# Altium PCB Solar.PcbDoc (part 2 of 2)
Units mm, origin at the board's own origin, x right, y up, seen from the top; angles counter-clockwise.
Board outline 89.66 x 101.6 mm, 2 copper layers (Top Layer, Bottom Layer); 143 components, 89 nets, 454 pads, 227 vias.
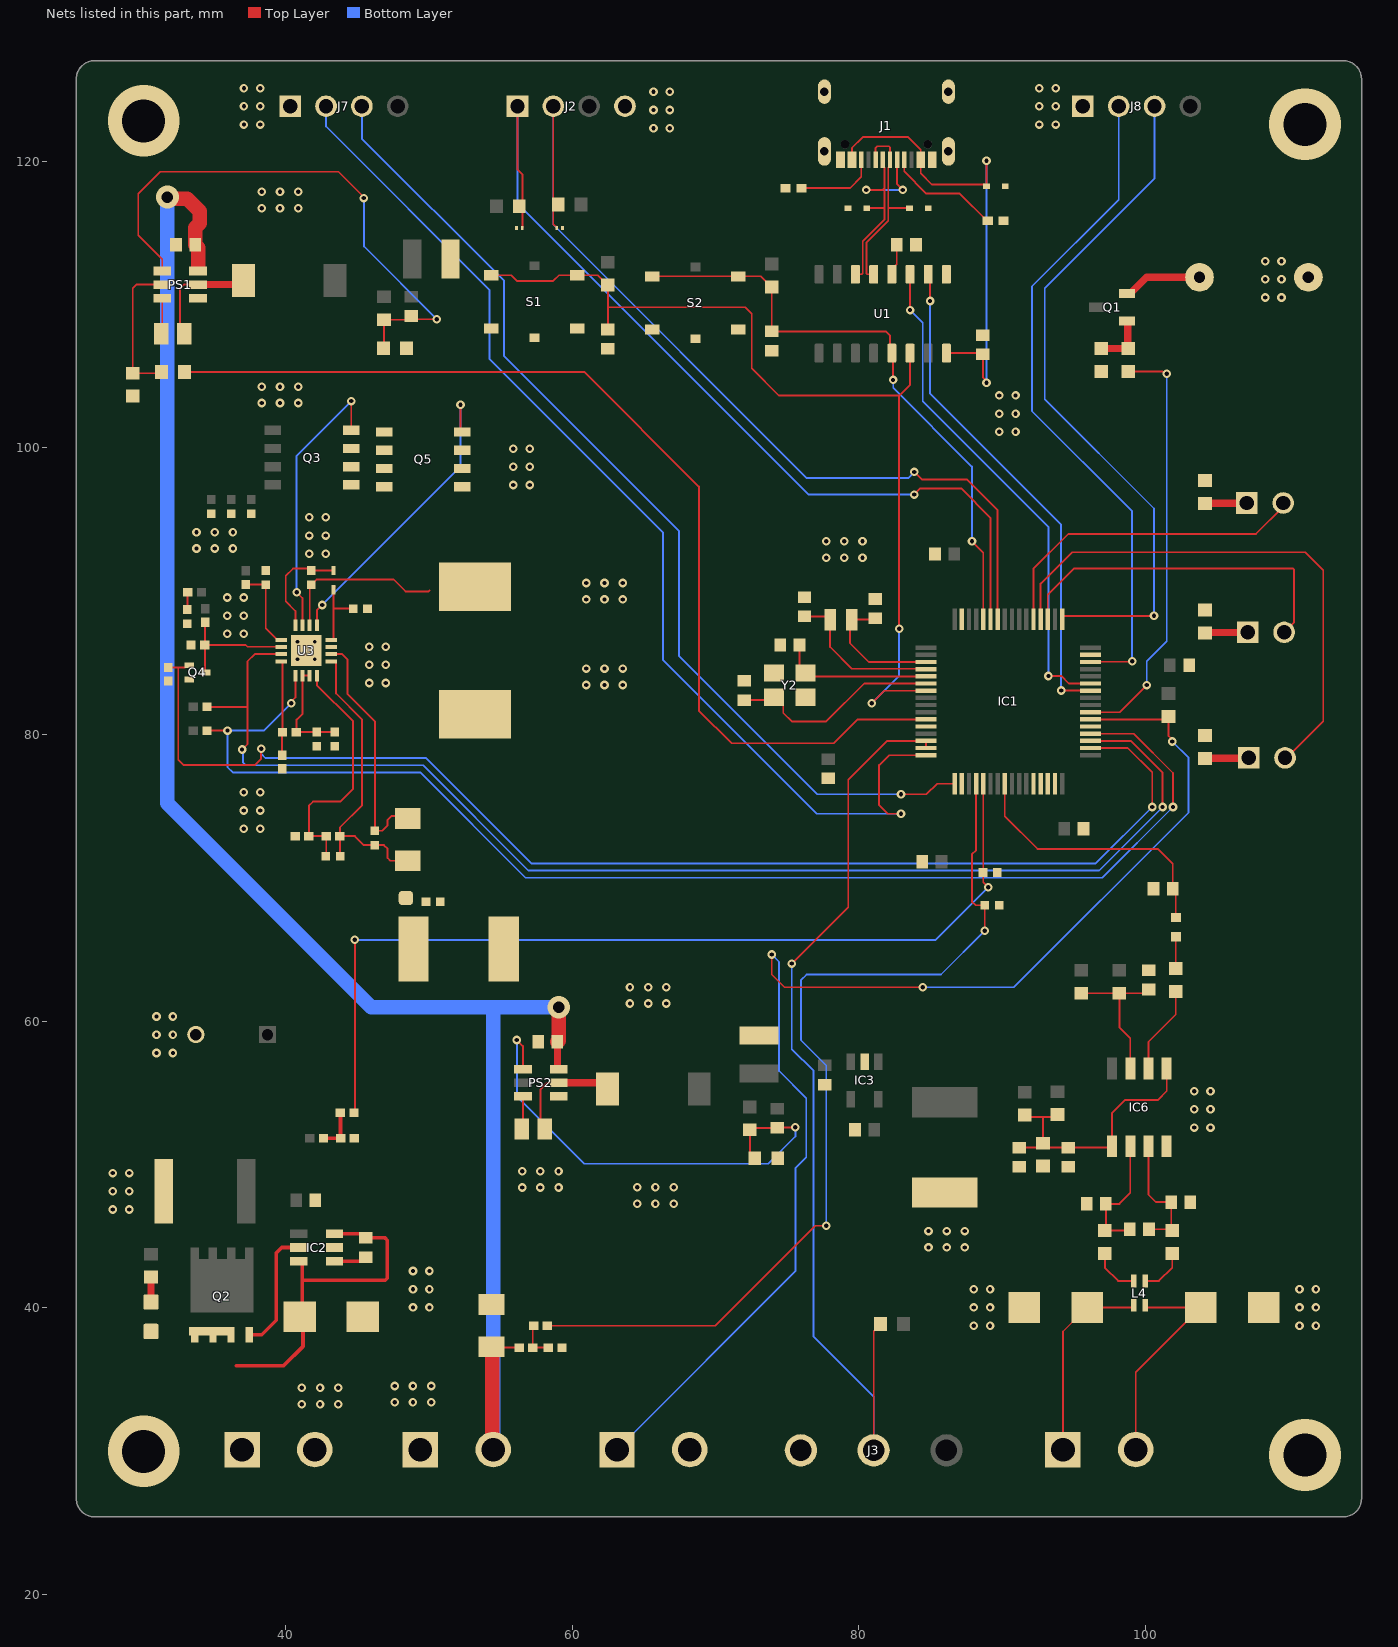
[diagram p2: the nets of this part, all layers, seen from the top]

## Via types
v1: diameter 0.6, hole 0.3, Top Layer to Bottom Layer, 168 vias
v2: diameter 0.6, hole 0.3, Top Layer to Bottom Layer, tented both sides, 49 vias
v3: diameter 0.508, hole 0.254, Top Layer to Bottom Layer, tented both sides, 4 vias
v4: diameter 5, hole 3, Top Layer to Bottom Layer, 4 vias
v5: diameter 1.6, hole 0.8, Top Layer to Bottom Layer, tented both sides, 2 vias

## Nets (pads, with @x,y where several pads share a name; then routed paths per layer and width w, separated by ;. In a path a pad name is that pad's centre, name@x,y a point inside that pad or via, vN(x,y) a via of type N, cw(c..) or ccw(c..) an arc to the next point about the centre after c; other vN are vias at no path point) (continued)
ADC_V_BAT: C14.1 IC1.20 R47.2 | length 65.6
  Top Layer w0.127: R47.2@58.26,38.735 69.977,38.735 76.962,45.72 v2(77.724,45.72) ; IC1.20@88.174,76.558 88.174,71.918 87.884,71.628 87.884,68.326 88.138,68.072 C14.1@88.781,68.072 88.773,68.064 v2(88.773,66.294)
  Bottom Layer w0.127: v2(77.724,45.72) 77.724,56.896 75.946,58.674 75.946,62.844 76.348,63.246 85.725,63.246 v2(88.773,66.294)
ADC_V_IN: C13.1 IC1.21 R46.2 | length 65.2
  Top Layer w0.127: R46.2@44.765,53.594 44.831,53.66 v2(44.831,65.659) ; IC1.21@88.674,76.558 88.674,69.695 v2(89.027,69.342)
  Bottom Layer w0.127: v2(44.831,65.659) 85.344,65.659 v2(89.027,69.342)
BAT+: C17.2 C21.2 F1.2 J9.2 PS1.3 PS2.3 R45.1 | length 126.6
  Top Layer w0.127: F1.2@54.422,37.212 54.423,37.211 R45.1@56.294,37.211
  Top Layer w0.508: C21.2@58.963,58.547 58.963,56.683 59.009,56.637 PS2.3@59.055,56.637
  Top Layer w1.016: v5(31.75,117.475) 31.862,117.363 33.132,117.363 33.996,116.499 33.996,115.657 33.69,115.351 C17.2@33.69,114.173 33.909,113.954 33.909,112.649 ; F1.2@54.361,37.273 54.422,37.212 54.422,30.16 J9.2@54.483,30.099 ; C21.2@58.963,58.547 59.055,58.639 v5(59.055,60.96)
  Bottom Layer w1.016: v5(31.75,117.475) 31.75,75.184 45.974,60.96 54.483,60.96 ; J9.2@54.483,30.099 54.483,60.96 ; v5(59.055,60.96) 54.483,60.96
BOOT: C5.1 IC1.60 R4.1 S2.1 S2.2 U1.13 | length 42.6
  Top Layer w0.127: S2.1@65.58,111.959 S2.2@71.58,111.959 73.134,111.959 73.889,111.204 R4.1@73.914,111.204 73.914,108.117 C5.1@73.919,108.112 81.88,108.112 82.169,107.823 82.169,106.724 82.381,106.512 v2(82.381,104.729) ; v2(87.884,93.472) 88.674,92.682 IC1.60@88.674,88.034
  Bottom Layer w0.127: v2(82.381,104.729) 82.388,104.722 82.388,104.175 87.884,98.679 v2(87.884,93.472)
BUZZER: IC1.39 R8.2 | length 29.7
  Top Layer w0.127: IC1.39@96.162,81.546 98.183,81.546 v2(100.076,83.439) ; R8.2@98.798,105.316 101.185,105.316 101.345,105.156 v2(101.473,105.156)
  Bottom Layer w0.127: v2(100.076,83.439) 100.076,85.09 101.473,86.487 v2(101.473,105.156)
CHARGE_DIS: IC1.34 Q4.1 R57.2 | length 89.5
  Top Layer w0.127: R57.2@31.817,84.668 32.512,84.668 ; Q4.1@33.274,84.82 33.149,84.82 32.997,84.668 32.512,84.668 ; v2(38.291,78.995) 38.291,78.296 37.846,77.851 32.893,77.851 32.512,78.232 32.512,84.668 ; IC1.34@96.162,79.046 98.754,79.046 100.457,77.343 v2(100.457,74.93)
  Bottom Layer w0.127: v2(38.291,78.995) 38.3,78.986 38.3,78.636 38.593,78.343 49.8,78.343 57.15,70.993 96.52,70.993 v2(100.457,74.93)
DBG_RX: IC1.43 U1.3 | length 35.2
  Top Layer w0.127: v2(83.566,109.601) U1.3@83.566,112.097 ; v2(93.218,84.074) 94.107,84.074 94.635,83.546 IC1.43@96.162,83.546
  Bottom Layer w0.127: v2(83.566,109.601) 84.455,108.712 84.455,103.251 93.218,94.488 v2(93.218,84.074)
DBG_SWCLK: IC1.49 J8.3 | length 48.5
  Top Layer w0.127: IC1.49@94.174,88.034 94.174,88.179 94.26,88.265 v2(100.584,88.265)
  Bottom Layer w0.127: v2(100.584,88.265) 100.584,95.758 92.964,103.378 92.964,111.125 100.624,118.785 J8.3@100.624,123.825
DBG_SWDIO: IC1.46 J8.2 | length 47.1
  Top Layer w0.127: IC1.46@96.162,85.046 96.184,85.068 99.038,85.068 v2(99.06,85.09)
  Bottom Layer w0.127: J8.2@98.124,123.825 98.124,117.301 92.075,111.252 92.075,102.552 99.06,95.567 v2(99.06,85.09)
DBG_TX: IC1.42 U1.2 | length 34.9
  Top Layer w0.127: U1.2@84.836,112.097 84.963,111.97 v2(84.963,110.236) ; v2(94.107,83.058) 94.113,83.052 96.156,83.052 IC1.42@96.162,83.046
  Bottom Layer w0.127: v2(84.963,110.236) 84.963,103.759 94.107,94.615 v2(94.107,83.058)
DE: IC1.28
DI: IC1.29
DIF_ADC: C36.1 FB1.2 IC1.24 | length 19.2
  Top Layer w0.127: IC1.24@90.174,76.558 90.174,74.291 92.456,72.009 100.838,72.009 101.889,70.958 C36.1@101.889,69.215 102.108,68.996 FB1.2@102.108,67.223
DIGITAL_IN: IC1.38 J4.1 R9.1 | length 89.7
  Top Layer w0.127: v2(73.914,64.643) 73.914,63.246 74.803,62.357 v2(84.455,62.357) ; IC1.38@96.162,81.046 101.404,81.046 R9.1@101.6,81.242 101.6,79.884 101.854,79.63 v2(101.854,79.502)
  Bottom Layer w0.127: J4.1@63.119,30.099 75.565,42.545 75.565,49.738 76.327,50.5 76.327,54.61 74.422,56.515 74.422,64.135 v2(73.914,64.643) ; v2(84.455,62.357) 90.805,62.357 102.997,74.549 102.997,78.359 v2(101.854,79.502)
FLOAT_IN: IC1.37
GND: C1.1 C2.1 C3.2 C4.2 C5.2 C6.1 C7.1 C8.2 C9.1 C10.2 C11.2 C12.2 C13.2 C14.2 C17.1 C19.1 C21.1 C23.1 C24.2 C25.2 C26.2 C27.2 C28.2 C32.2 C36.2 C37.2 C38.2 C39.1 C40.2 C41.1 C42.1 C43.1 C44.1 C45.1 C46.1 C47.2 C48.1 C52.2 C53.2 C55.1 C56.1 D1.1 D2.1 D3.1 D4.1 D5.1 D6.2 D7.C D16.2 D17.2 IC1.12 IC1.18 IC1.31 IC1.47 IC1.63 IC2.2 IC3.2 IC6.4 J1.A1_B12 J1.B1_A12 J1.S1 J1.S2 J1.S3 J1.S4 J2.4 J3.1 J4.2 J6.2 J7.1 J8.1 J9.1 LS1.2 PS1.1 PS2.1 Q4.3 Q5.1 Q5.2 Q5.3 R1.2 R2.1 R11.2 R14.1 R16.1 R20.2 R40.1 R43.1 R48.1 R49.2 R56.1 R57.1 R58.1 R60.1 R62.1 R63.1 S1.3 S1.4 S1.G2 S2.3 S2.4 S2.G2 U1.1 U3.11 U3.17 Y2.2 Y2.4
  other v1: 41.134,33.268 42.404,33.268 43.674,33.268 47.611,33.395 48.881,33.395 50.151,33.395 41.134,34.411 42.404,34.411 43.674,34.411 47.611,34.538 48.881,34.538 50.151,34.538 88.005,38.749 89.148,38.749 110.738,38.749 111.881,38.749 48.889,40.019 50.032,40.019 88.005,40.019 89.148,40.019 110.738,40.019 111.881,40.019 48.889,41.289 50.032,41.289 88.005,41.289 89.148,41.289 110.738,41.289 111.881,41.289 48.889,42.559 50.032,42.559 84.85,44.202 86.12,44.202 87.39,44.202 84.85,45.345 86.12,45.345 87.39,45.345 27.946,46.849 29.089,46.849 64.53,47.25 65.8,47.25 67.07,47.25 27.946,48.119 29.089,48.119 56.501,48.381 57.771,48.381 59.041,48.381 64.53,48.393 65.8,48.393 67.07,48.393 27.946,49.389 29.089,49.389 56.501,49.524 57.771,49.524 59.041,49.524 103.384,52.564 104.527,52.564 103.384,53.834 104.527,53.834 103.384,55.104 104.527,55.104 30.994,57.771 32.137,57.771 30.994,59.041 32.137,59.041 30.994,60.311 32.137,60.311 64.022,61.22 65.292,61.22 66.562,61.22 64.022,62.363 65.292,62.363 66.562,62.363 37.078,73.42 38.221,73.42 37.078,74.69 38.221,74.69 37.078,75.96 38.221,75.96 60.974,83.445 62.244,83.445 63.514,83.445 45.841,83.58 46.984,83.58 60.974,84.588 62.244,84.588 63.514,84.588 45.841,84.85 46.984,84.85 45.841,86.12 46.984,86.12 35.935,87.009 37.078,87.009 35.935,88.279 37.078,88.279 60.974,89.414 62.244,89.414 63.514,89.414 35.935,89.549 37.078,89.549 60.974,90.557 62.244,90.557 63.514,90.557 77.71,92.323 78.98,92.323 80.25,92.323 41.65,92.597 42.793,92.597 33.782,92.964 35.052,92.964 36.322,92.964 77.71,93.466 78.98,93.466 80.25,93.466 41.65,93.867 42.793,93.867 33.782,94.107 35.052,94.107 36.322,94.107 41.65,95.137 42.793,95.137 55.886,97.395 57.029,97.395 55.886,98.665 57.029,98.665 55.886,99.935 57.029,99.935 89.783,101.106 90.926,101.106 89.783,102.376 90.926,102.376 38.34,103.118 39.61,103.118 40.88,103.118 89.783,103.646 90.926,103.646 38.34,104.261 39.61,104.261 40.88,104.261 108.337,110.476 109.48,110.476 108.337,111.746 109.48,111.746 108.337,113.016 109.48,113.016 38.34,116.707 39.61,116.707 40.88,116.707 38.34,117.85 39.61,117.85 40.88,117.85 65.665,122.287 66.808,122.287 37.09,122.541 38.233,122.541 92.589,122.541 93.732,122.541 65.665,123.557 66.808,123.557 37.09,123.811 38.233,123.811 92.589,123.811 93.732,123.811 65.665,124.827 66.808,124.827 37.09,125.081 38.233,125.081 92.589,125.081 93.732,125.081
  other v3: 40.83,85.248 42.03,85.248 40.83,86.448 42.03,86.448
  other v4: 111.125,29.718 30.099,29.972 111.125,122.555 30.099,122.809
HSE_OSC_IN: C55.2 IC1.5 Y2.1 | length 10.6
  Top Layer w0.127: C55.2@75.854,86.233 75.854,84.719 76.527,84.046 IC1.5@84.686,84.046
HSE_OSC_OUT: C56.2 IC1.6 Y2.3 | length 14.9
  Top Layer w0.127: C56.2@72.009,82.388 73.883,82.388 Y2.3@74.084,82.589 74.184,82.589 74.721,82.052 74.721,81.489 75.311,80.899 77.724,80.899 80.371,83.546 IC1.6@84.686,83.546
I2C_1_CLK: D4.2 IC1.58 J2.2 R6.1 | length 64.1
  Top Layer w0.127: J2.2@58.674,123.825 58.674,115.6 58.909,115.365 D4.2@58.909,115.316 ; v2(83.862,98.309) 84.381,97.79 87.515,97.79 89.674,95.631 IC1.58@89.674,88.034
  Bottom Layer w0.127: J2.2@58.674,123.825 58.674,115.57 76.362,97.882 83.435,97.882 v2(83.862,98.309)
I2C_1_SDA: D5.2 IC1.59 J2.1 R5.1 | length 64.9
  Top Layer w0.127: J2.1@56.174,123.825 56.174,119.42 56.515,119.079 D5.2@56.515,115.316 ; v2(83.862,96.728) 84.289,97.155 87.122,97.155 89.174,95.103 IC1.59@89.174,88.034
  Bottom Layer w0.127: J2.1@56.174,123.825 56.174,117.042 76.488,96.728 v2(83.862,96.728)
LSE_OSC_IN: C7.2 IC1.3 Y1.1 | length 9.3
  Top Layer w0.127: C7.2@81.153,88.103 81.061,88.011 Y1.1@79.49,88.011 79.375,87.896 79.375,86.36 80.689,85.046 IC1.3@84.686,85.046
LSE_OSC_OUT: C6.2 IC1.4 Y1.2 | length 11.1
  Top Layer w0.127: C6.2@76.2,88.23 77.771,88.23 Y1.2@77.99,88.011 77.99,86.094 79.502,84.582 84.65,84.582 IC1.4@84.686,84.546
NetC2_2: C2.2 U1.4 | length 2.2
  Top Layer w0.127: U1.4@82.296,112.097 82.296,112.45 82.642,112.796 C2.2@82.642,114.173
NetC15_1: C15.1 D6.1 IC2.3 IC2.6 J6.1 Q2.1 Q2.2 Q2.3 Q2.10 | length 23.5
  Top Layer w0.254: 36.556,35.941 39.858,35.941 41.214,37.297 41.214,39.37 41.148,39.436 41.148,41.91 ; IC2.6@41.148,43.246 41.148,41.91 ; IC2.3@43.648,45.146 45.482,45.146 45.762,44.866 45.827,44.866 46.935,44.866 47.097,44.704 47.097,42.059 46.948,41.91 41.148,41.91
NetC15_2: C15.2 IC2.1 | length 2.3
  Top Layer w0.254: IC2.1@43.414,43.246 45.248,43.246 45.528,43.526 C15.2@45.593,43.526
NetC16_1: C16.1 L2.1 PS1.2 | length 7.9
  Top Layer w0.127: C16.1@32.931,107.95 32.639,108.242 32.639,111.125 32.893,111.379 PS1.2@33.889,111.379
  Top Layer w0.508: PS1.2@33.889,111.379 36.78,111.379 L2.1@37.059,111.658
NetC16_2: C16.2 PS1.6 | length 2.5
  Top Layer w0.127: C16.2@31.331,107.95 31.389,108.008 PS1.6@31.389,110.429
NetC18_1: C18.1 PS1.4 R13.1 R14.2 | length 39.7
  Top Layer w0.127: PS1.4@31.389,112.329 31.389,113.137 29.718,114.808 29.718,117.729 31.242,119.253 43.688,119.253 v2@45.466,117.475 ; R14.2@46.825,106.934 46.863,106.972 R13.1@46.863,108.928 48.511,108.928 C18.1@48.768,109.185 48.987,108.966 v2(50.546,108.966)
  Bottom Layer w0.127: v2@45.466,117.475 45.466,114.046 v2(50.546,108.966)
  other v2: 45.451,117.415
NetC20_1: C20.1 L3.1 PS2.2 | length 8
  Top Layer w0.127: C20.1@58.077,52.451 57.785,52.743 57.785,55.245 58.227,55.687 PS2.2@59.055,55.687
  Top Layer w0.508: PS2.2@59.055,55.687 62.017,55.687 L3.1@62.459,55.245
NetC20_2: C20.2 PS2.6 | length 2.3
  Top Layer w0.127: C20.2@56.477,52.451 56.555,52.529 PS2.6@56.555,54.737
NetC22_1: C22.1 PS2.4 R15.1 R16.2 | length 34.3
  Top Layer w0.127: v2(56.134,58.674) 56.555,58.253 PS2.4@56.555,56.637 ; R16.2@72.733,50.419 72.39,50.762 R15.1@72.39,52.413 72.52,52.543 C22.1@74.295,52.543 74.33,52.578 v2(75.565,52.578)
  Bottom Layer w0.127: v2(56.134,58.674) 56.134,54.737 60.833,50.038 73.66,50.038 75.565,51.943 v2(75.565,52.578)
NetC32_1: C32.1 IC6.7 R34.1 R64.1 | length 10.4
  Top Layer w0.127: R34.1@95.504,61.938 R64.1@98.171,61.938 ; IC6.7@98.933,56.687 98.933,58.801 98.171,59.563 R64.1@98.171,61.938 ; C32.1@100.203,62.195 99.946,61.938 R64.1@98.171,61.938
NetC35_1: C35.1 C39.2 IC6.2 R35.2 | length 9
  Top Layer w0.127: C35.1@98.898,45.466 98.809,45.377 R35.2@97.155,45.377 97.225,45.447 C39.2@97.225,47.244 98.171,47.244 98.933,48.006 IC6.2@98.933,51.263
NetC35_2: C35.2 C40.1 IC6.3 R36.2 | length 8.8
  Top Layer w0.127: IC6.3@100.203,51.263 100.203,47.879 100.711,47.371 C40.1@101.784,47.371 R36.2@101.784,45.447 ; C35.2@100.238,45.466 101.765,45.466 R36.2@101.784,45.447 ; R36.2@101.854,45.377 R36.2@101.784,45.447
NetC37_1: C37.1 C38.1 IC6.1 IC6.5 R42.1 R43.2 R65.1 | length 19
  Top Layer w0.127: C38.1@91.186,51.168 C37.1@94.615,51.168 97.568,51.168 IC6.1@97.663,51.263 97.663,53.594 98.552,54.483 100.838,54.483 101.473,55.118 IC6.5@101.473,56.687 ; R42.1@91.567,53.302 92.818,53.302 ; R43.2@92.837,51.473 92.837,53.283 92.818,53.302 ; R65.1@93.853,53.467 93.688,53.302 92.818,53.302
NetC43_2: C43.2 R51.2 U3.1 | length 5.8
  Top Layer w0.127: R51.2@37.211,90.457 38.583,90.457 C43.2@38.608,90.432 38.608,87.41 39.42,86.598 U3.1@39.68,86.598
NetC47_1: C47.1 R50.1 | length 1.2
  Top Layer w0.127: C47.1@33.147,88.712 33.163,88.728 33.163,89.9 R50.1@33.18,89.916
NetC48_2: C48.2 D18.1 U3.12 | length 5.2
  Top Layer w0.127: U3.12@43.18,86.598 43.263,86.598 43.339,86.675 43.339,88.773 ; D18.1@43.426,90.305 43.339,90.218 D18.1@43.339,90.08 43.339,88.773 ; C48.2@44.712,88.773 43.339,88.773
NetC49_1: C49.1 D18.2 U3.16 | length 7.5
  Top Layer w0.127: U3.16@40.68,87.598 40.68,88.606 40.005,89.281 40.005,91.059 40.513,91.567 41.648,91.567 C49.1@41.783,91.432 ; C49.1@41.783,91.178 C49.1@41.892,91.287 ; C49.1@41.785,91.43 D18.2@43.339,91.43
NetC49_2: C49.2 L1.1 Q3.1 Q3.2 Q3.3 Q5.5 Q5.6 Q5.7 Q5.8 U3.14 | length 11.7
  Top Layer w0.127: U3.14@41.68,87.598 41.68,90.329 C49.2@41.783,90.432 42.156,90.805 47.534,90.805 48.362,89.977 49.972,89.977 50.038,90.043
NetC51_2: C51.2 R55.1 R60.2 U3.8 | length 17.3
  Top Layer w0.127: U3.8@42.18,84.098 42.18,83.423 44.704,80.899 44.704,76.2 43.815,75.311 41.91,75.311 41.623,75.024 R60.2@41.623,72.898 R55.1@42.832,72.898 42.832,71.526 C51.2@42.807,71.501
NetD7_A: D7.A R12.2 | length 1.7
  Top Layer w0.508: D7.A@30.607,40.395 R12.2@30.607,42.126
NetD8_A: D8.A IC1.53 | length 23
  Top Layer w0.127: IC1.53@92.174,88.034 92.174,91.539 94.615,93.98 107.696,93.98 109.601,95.885 D8.A@109.601,96.139
NetD8_C: D8.C R40.2 | length 2.9
  Top Layer w0.508: R40.2@104.14,96.101 104.159,96.12 107.042,96.12 D8.C@107.061,96.139
NetD9_A: D9.A IC1.52 | length 37.9
  Top Layer w0.127: IC1.52@92.674,88.034 92.674,90.515 94.869,92.71 111.125,92.71 112.395,91.44 112.395,80.899 109.855,78.359 D9.A@109.728,78.359
NetD9_C: D9.C R62.2 | length 3.1
  Top Layer w0.508: R62.2@104.14,78.321 104.159,78.34 107.169,78.34 D9.C@107.188,78.359
NetD16_1: D16.1 J15.2 L4.4 | length 15.7
  Top Layer w0.127: J15.2@99.314,30.099 99.314,35.499 D16.1@103.82,40.005 ; L4.4@99.968,40.171 99.968,40.141 100.104,40.005 D16.1@103.82,40.005 ; D16.1@103.845,40.005 D16.1@103.82,40.005
NetD17_1: D17.1 J15.1 L4.1 | length 13.9
  Top Layer w0.127: J15.1@94.234,30.099 94.234,38.338 95.901,40.005 D17.1@95.926,40.005 99.032,40.005 99.168,40.141 L4.1@99.168,40.171
NetD19_A: D19.A IC1.51 | length 24.3
  Top Layer w0.127: IC1.51@93.174,88.034 93.174,89.745 94.996,91.567 110.289,91.567 110.363,91.493 110.363,87.82 D19.A@109.664,87.122
NetD19_C: D19.C R63.2 | length 3
  Top Layer w0.508: R63.2@104.14,87.084 104.159,87.103 107.105,87.103 D19.C@107.124,87.122
NetFB1_1: FB1.1 R41.2 | length 2.2
  Top Layer w0.127: R41.2@102.108,63.665 FB1.1@102.108,65.873
NetIC2_5: IC2.5 Q2.4 | length 8.7
  Top Layer w0.254: Q2.4@37.699,38.104 38.338,38.104 39.35,39.116 39.35,43.815 39.731,44.196 IC2.5@41.148,44.196
NetIC6_6: IC6.6 R41.1 | length 6.2
  Top Layer w0.127: IC6.6@100.203,56.687 100.203,58.547 102.108,60.452 R41.1@102.108,62.065
NetJ1_A5: J1.A5 R1.1 | length 8.1
  Top Layer w0.127: J1.A5@83.165,120.091 83.165,119.273 84.709,117.729 87.03,117.729 88.935,115.824 R1.1@88.985,115.824
NetJ1_B5: J1.B5 R2.2 | length 5.7
  Top Layer w0.127: R2.2@75.988,118.11 79.375,118.11 80.165,118.9 J1.B5@80.165,120.091
NetL4_2: L4.2 R35.1 | length 3.4
  Top Layer w0.127: R35.1@97.155,43.777 97.155,42.799 98.083,41.871 L4.2@99.168,41.871
NetL4_3: L4.3 R36.1 | length 3.2
  Top Layer w0.127: L4.3@99.968,41.871 100.926,41.871 101.854,42.799 R36.1@101.854,43.777
NetLS1_1: LS1.1 Q1.2 | length 5.5
  Top Layer w0.508: Q1.2@98.705,110.759 98.93,110.759 100.058,111.887 LS1.1@103.759,111.887
NetPS1_5: PS1.5 R19.1 R20.1 | length 10.1
  Top Layer w0.127: R19.1@31.331,105.283 31.242,105.194 R20.1@29.337,105.194 29.337,111.125 29.591,111.379 PS1.5@31.389,111.379
NetQ1_1: Q1.1 R8.1 R11.1 | length 3.9
  Top Layer w0.508: R11.1@96.893,106.916 R8.1@98.798,106.916 98.752,106.963 98.752,108.793 Q1.1@98.705,108.839
NetQ3_4: Q3.4 U3.15 | length 19.4
  Top Layer w0.127: v2(40.767,89.916) 41.175,89.508 41.175,87.603 U3.15@41.18,87.598 ; Q3.4@44.566,101.219 44.577,101.23 v2(44.577,103.251)
  Bottom Layer w0.127: v2(40.767,89.916) 40.767,99.441 v2(44.577,103.251)
NetQ5_4: Q5.4 U3.13 | length 21.5
  Top Layer w0.127: U3.13@42.18,87.598 42.18,88.662 v2(42.545,89.027) ; v2(52.197,102.997) 52.197,101.219 Q5.4@52.324,101.092
  Bottom Layer w0.127: v2(42.545,89.027) 52.197,98.679 v2(52.197,102.997)
NetR44_1: R44.1 R46.1 R48.2 | length 3
  Top Layer w0.254: R44.1@42.639,51.816 R48.2@43.848,51.816 43.831,51.832 43.831,53.578 R46.1@43.815,53.594
NetR45_2: R45.2 R47.1 R49.1 | length 2.6
  Top Layer w0.127: R47.1@57.31,38.735 57.244,38.669 R45.2@57.244,37.211 R49.1@58.326,37.211
NRST: C4.1 IC1.7 R3.1 S1.1 S1.2 U1.14 | length 66.6
  Top Layer w0.127: S1.1@54.356,112.031 55.736,112.031 56.134,111.633 58.674,111.633 59.072,112.031 S1.2@60.356,112.031 61.769,112.031 62.459,111.341 R3.1@62.484,111.341 62.484,109.798 62.489,109.793 ; C4.1@62.489,108.249 62.489,109.793 ; v2(80.899,82.169) 81.776,83.046 IC1.7@84.686,83.046 ; v2(82.804,87.376) 82.804,103.632 ; U1.14@83.566,106.597 83.566,104.394 82.804,103.632 ; 62.489,109.793 72.071,109.793 72.517,109.347 72.517,105.537 74.422,103.632 82.804,103.632
  Bottom Layer w0.127: v2(80.899,82.169) 82.804,84.074 v2(82.804,87.376)
RO: IC1.30
SENSOR: R53.1 R58.2 U3.4 | length 6.6
  Top Layer w0.127: U3.4@39.68,85.098 39.707,85.098 39.784,85.022 R53.1@39.784,80.137 39.751,80.104 R58.2@39.751,78.547
SIM_EN: IC1.11 R19.2 | length 72.3
  Top Layer w0.127: R19.2@32.931,105.283 60.833,105.283 68.834,97.282 68.834,81.661 71.12,79.375 78.232,79.375 79.883,81.026 84.666,81.026 IC1.11@84.686,81.046
SIM_RX: IC1.17 J7.3 | length 71.1
  Top Layer w0.127: v2(82.931,75.819) 84.709,75.819 85.448,76.558 IC1.17@86.674,76.558
  Bottom Layer w0.127: J7.3@45.319,123.825 45.319,121.559 55.245,111.633 55.245,106.386 67.437,94.194 67.437,85.471 77.089,75.819 v2(82.931,75.819)
SIM_TX: IC1.16 J7.2 | length 77.6
  Top Layer w0.127: v2(82.931,74.462) 82.002,74.462 81.407,75.057 81.407,77.851 82.102,78.546 IC1.16@84.686,78.546
  Bottom Layer w0.127: J7.2@42.819,123.825 42.819,122.408 54.229,110.998 54.229,106.172 66.334,94.067 66.334,85.177 77.049,74.462 v2(82.931,74.462)
SR_N: C50.1 C51.1 C52.1 C53.1 F1.1 R54.2 R55.2 TP1.0 U3.9 | length 21.1
  Top Layer w0.127: U3.9@43.18,85.098 43.44,85.098 43.517,85.022 43.517,82.848 45.339,81.026 45.339,75.057 43.782,73.5 R55.2@43.782,72.898 ; C51.1@43.807,71.501 43.782,71.526 R55.2@43.782,72.898 ; R54.2@48.519,71.182 47.309,71.182 47.117,71.374 47.117,72.009 46.855,72.271 C50.1@46.228,72.271 45.458,72.271 44.831,72.898 R55.2@43.782,72.898
SR_P: C50.2 L1.2 R54.1 U3.10 | length 17
  Top Layer w0.127: U3.10@43.18,85.598 43.942,85.598 44.323,85.217 44.323,82.804 46.228,80.899 C50.2@46.228,73.271 46.728,73.271 47.117,73.66 47.117,74.041 47.371,74.295 48.356,74.295 R54.1@48.519,74.132
STATUS1: IC1.35 R59.2 U3.3 | length 90.1
  Top Layer w0.127: R59.2@34.511,81.915 37.338,81.915 ; v2(36.961,78.942) 37.338,79.319 37.338,81.915 ; U3.3@39.68,85.598 37.846,85.598 37.338,85.09 37.338,81.915 ; IC1.35@96.162,79.546 98.961,79.546 101.184,77.323 v2(101.184,74.93)
  Bottom Layer w0.127: v2(36.961,78.942) 37.032,78.871 37.032,78.03 37.219,77.843 49.593,77.843 56.943,70.493 96.747,70.493 v2(101.184,74.93)
STATUS2: IC1.36 R61.2 U3.5 | length 91.7
  Top Layer w0.127: R61.2@34.511,80.264 v2(35.941,80.264) ; v2(40.386,82.169) 40.386,82.275 40.68,82.569 U3.5@40.68,84.098 ; IC1.36@96.162,80.046 99.168,80.046 101.911,77.303 v2(101.911,74.93)
  Bottom Layer w0.127: v2(40.386,82.169) 38.481,80.264 v2(35.941,80.264) 35.941,77.724 36.322,77.343 49.386,77.343 56.736,69.993 96.974,69.993 v2(101.911,74.93)
TMP: IC1.14 IC1.15 J3.2 R7.1 | length 66.9
  Top Layer w0.127: v2(75.311,64.008) 79.248,67.945 79.248,76.835 81.959,79.546 IC1.14@84.686,79.546 IC1.15@84.686,79.046 ; J3.2@81.026,30.049 81.026,38.367 81.496,38.837 R7.1@81.496,38.862
  Bottom Layer w0.127: v2(75.311,64.008) 75.311,58.039 76.835,56.515 76.835,37.973 81.026,33.782 J3.2@81.026,30.049
USB_N: D3.2 J1.A7 J1.B7 U1.6 | length 16.5
  Top Layer w0.127: U1.6@79.756,112.097 80.19,112.097 80.264,112.171 80.264,114.405 81.788,115.929 81.788,116.713 ; v2(80.518,117.983) 81.64,117.983 81.788,118.131 ; D3.2@80.543,116.713 81.788,116.713 ; J1.A7@81.665,120.091 81.665,119.671 81.788,119.548 81.788,118.131 ; J1.B7@82.665,120.091 82.665,118.376 v2(83.058,117.983) ; 81.788,116.713 81.788,118.131
  Bottom Layer w0.127: v2(80.518,117.983) v2(83.058,117.983)
USB_P: D2.2 J1.A6 J1.B6 U1.5 | length 13.4
  Top Layer w0.127: U1.5@81.026,112.097 80.592,112.097 80.518,112.171 80.518,114.3 82.042,115.824 82.042,116.713 ; J1.B6@81.165,120.091 81.165,120.916 81.284,121.035 82.091,121.035 82.165,120.961 J1.A6@82.165,120.091 82.165,119.671 82.042,119.548 82.042,116.713 ; D2.2@83.516,116.586 83.389,116.713 82.042,116.713
USB_VBUS: C1.2 D1.2 J1.A4_B9 J1.B4_A9 U1.16 | length 35
  Top Layer w0.127: J1.B4_A9@79.515,120.091 79.515,120.917 80.264,121.666 83.439,121.666 84.315,120.79 J1.A4_B9@84.315,120.091 84.315,119.139 85.09,118.364 88.759,118.364 D1.2@88.886,118.237 88.9,118.251 v2(88.9,120.015) ; U1.16@86.106,106.597 88.313,106.597 C1.2@88.646,106.264 ; C1.2@88.646,106.518 C1.2@88.646,106.264 ; v2(88.9,104.521) 88.9,104.649 88.646,104.903 C1.2@88.646,106.264
  Bottom Layer w0.127: v2(88.9,104.521) v2(88.9,120.015)
VMPP: Q4.2 R52.1 R56.2 U3.2 | length 8.9
  Top Layer w0.127: R56.2@34.351,86.233 R56.2@34.38,86.233 ; R52.1@34.38,87.823 R56.2@34.38,86.233 ; Q4.2@34.424,84.32 34.38,84.364 R56.2@34.38,86.233 ; U3.2@39.68,86.098 39.672,86.106 37.338,86.106 37.211,86.233 R56.2@34.38,86.233
VREF: C44.2 C45.2 R53.2 U3.6 U3.7 | length 7.3
  Top Layer w0.127: R53.2@40.734,80.137 R53.2@40.763,80.166 ; U3.7@41.68,84.098 U3.6@41.18,84.098 41.18,81.439 40.767,81.026 40.767,80.17 R53.2@40.763,80.166 ; C44.2@43.434,80.166 C45.2@42.164,80.166 R53.2@40.763,80.166
pads on no net: IC1.1 IC1.2 IC1.8 IC1.9 IC1.10 IC1.27 IC1.33 IC1.40 IC1.41 IC1.44 IC1.45 IC1.50 IC1.54 IC1.55 IC1.56 IC1.57 IC1.61 IC1.62 IC3.4 IC6.8 J1. J1.A8 J1.B8 PS2.5 S1.G1 S2.G1 U1.7 U1.8 U1.9 U1.10 U1.11 U1.12 U1.15

## Polygon pours and split planes (outlines as drawn)
SR_P on Top Layer "SR_P_L01_P000" (solid, pour order 0): 49.022,83.185 50.292,84.455 56.261,84.455 57.277,83.439 57.277,75.819 54.356,72.898 47.879,72.898 46.99,73.787 46.99,78.867 49.022,80.899
GND on Top Layer "GND_L01_P008" (solid, pour order 8): 26.035,125.349 cw(c27.051,125.349) 27.051,126.365 113.157,126.365 cw(c113.157,125.222) 114.3,125.222 114.3,27.305 cw(c113.284,27.305) 113.284,26.289 27.051,26.289 cw(c27.051,27.305) 26.035,27.305
+4.1V on Top Layer "+4.1V_L01_P006" (solid, pour order 6): 49.911,114.554 49.911,110.809 49.162,110.059 42.331,110.059 41.961,110.429 41.961,112.888 42.423,113.35 45.771,113.35 47.355,114.935 49.53,114.935
+5 on Top Layer "+5_L01_P005" (solid, pour order 5): 75.057,56.769 75.057,53.77 74.765,53.478 67.934,53.478 67.564,53.848 67.564,56.306 67.678,56.42 71.025,56.42 71.882,57.277 74.549,57.277 71.882,57.277 74.549,57.277
SR_N on Top Layer "SR_N_L01_P004" (solid, pour order 4): 45.212,72.263 45.72,72.771 49.657,72.771 50.8,71.628 50.8,69.469 50.292,68.961 50.292,52.324 55.88,46.736 55.88,39.116 55.626,38.862 52.324,38.862 51.943,39.243 51.943,46.101 46.736,51.308 46.736,69.215 45.212,70.739
NetC49_2 on Top Layer "NETC49_2_L01_P003" (solid, pour order 3): 51.308,96.139 53.34,94.107 55.118,94.107 57.023,92.202 57.023,88.265 56.261,87.503 50.292,87.503 48.514,89.281 48.514,90.551 46.355,92.71 45.974,92.71 43.561,95.123 43.561,100.457 43.688,100.584 45.339,100.584 45.72,100.965 45.72,101.854 46.101,102.235 50.927,102.235 51.308,101.854
+VIN on Top Layer "+VIN_L01_P002" (solid, pour order 2): 37.084,68.326 30.607,74.803 30.607,92.329 34.417,96.139 43.053,96.139 43.561,96.647 43.561,101.854 43.18,102.235 29.337,102.235 26.289,99.187 26.289,70.739 34.163,62.865 35.56,61.468 35.56,49.911 32.893,47.244 32.893,39.37 33.02,39.243 37.973,39.243 38.608,39.878 38.608,44.323 39.116,44.831 41.529,44.831 41.783,45.085 41.783,45.974 41.402,46.355 41.402,64.008
NetC15_1 on Top Layer "NETC15_1_L01_P001" (solid, pour order 1): 34.036,28.003 37.465,28.003 38.481,29.019 38.481,33.084 36.957,34.608 36.957,39.052 36.703,39.306 33.326,39.306 33.02,39 33.02,36.767 33.782,36.005 33.782,28.258
GND on Bottom Layer "GND_L02_P007" (solid, pour order 7): 26.035,125.349 cw(c27.051,125.349) 27.051,126.365 113.157,126.365 cw(c113.157,125.222) 114.3,125.222 114.3,27.305 cw(c113.284,27.305) 113.284,26.289 27.051,26.289 cw(c27.051,27.305) 26.035,27.305

## Silkscreen, mask and mechanical layers (free items; w line width, h text height)
Top Overlay:
  text "DISPLAY" at 55.499,117.983 h1.52
  text "SIM" at 42.037,117.856 h1.52
  text "SWD" at 97.536,117.729 h1.52
  text "+ TEMP -" at 74.168,34.544 h1.52
  text "DIFF ADC" at 91.948,33.782 h1.52
  text "+ DIN -" at 60.579,33.528 h1.52
  text "+ VIN -" at 34.417,33.401 h1.52
  text "+ BAT -" at 46.609,33.401 h1.52
Mechanical 1:
  lines w0.254: 25.4,26.67 ccw(c26.67,26.67) 26.67,25.4 113.792,25.4 ccw(c113.792,26.67) 115.062,26.67 115.062,125.73 ccw(c113.792,125.73) 113.792,127 26.67,127 ccw(c26.67,125.73) 25.4,125.73 25.4,112.903 25.4,26.67

## Dimensions
113.792,127 to 113.792,25.4 on Top Overlay
115.062,125.73 to 25.4,125.73 on Top Overlay
111.125,122.555 to 111.125,29.718 on Top Overlay
30.099,122.809 to 111.125,122.555 on Top Overlay

## Text inside footprints (layer, text, board x,y; h text height)
J1: Mechanical 13 "PCB EDGE" at 76.715,126.741 h0.51 r180